# Altium PCB PCB1.pcbdoc
Units mm, origin at the board's own origin, x right, y up, seen from the top; angles counter-clockwise.
Board outline 92.49 x 53.72 mm, 2 copper layers (Top Layer, Bottom Layer); 11 components, 10 nets, 32 pads, 0 vias.
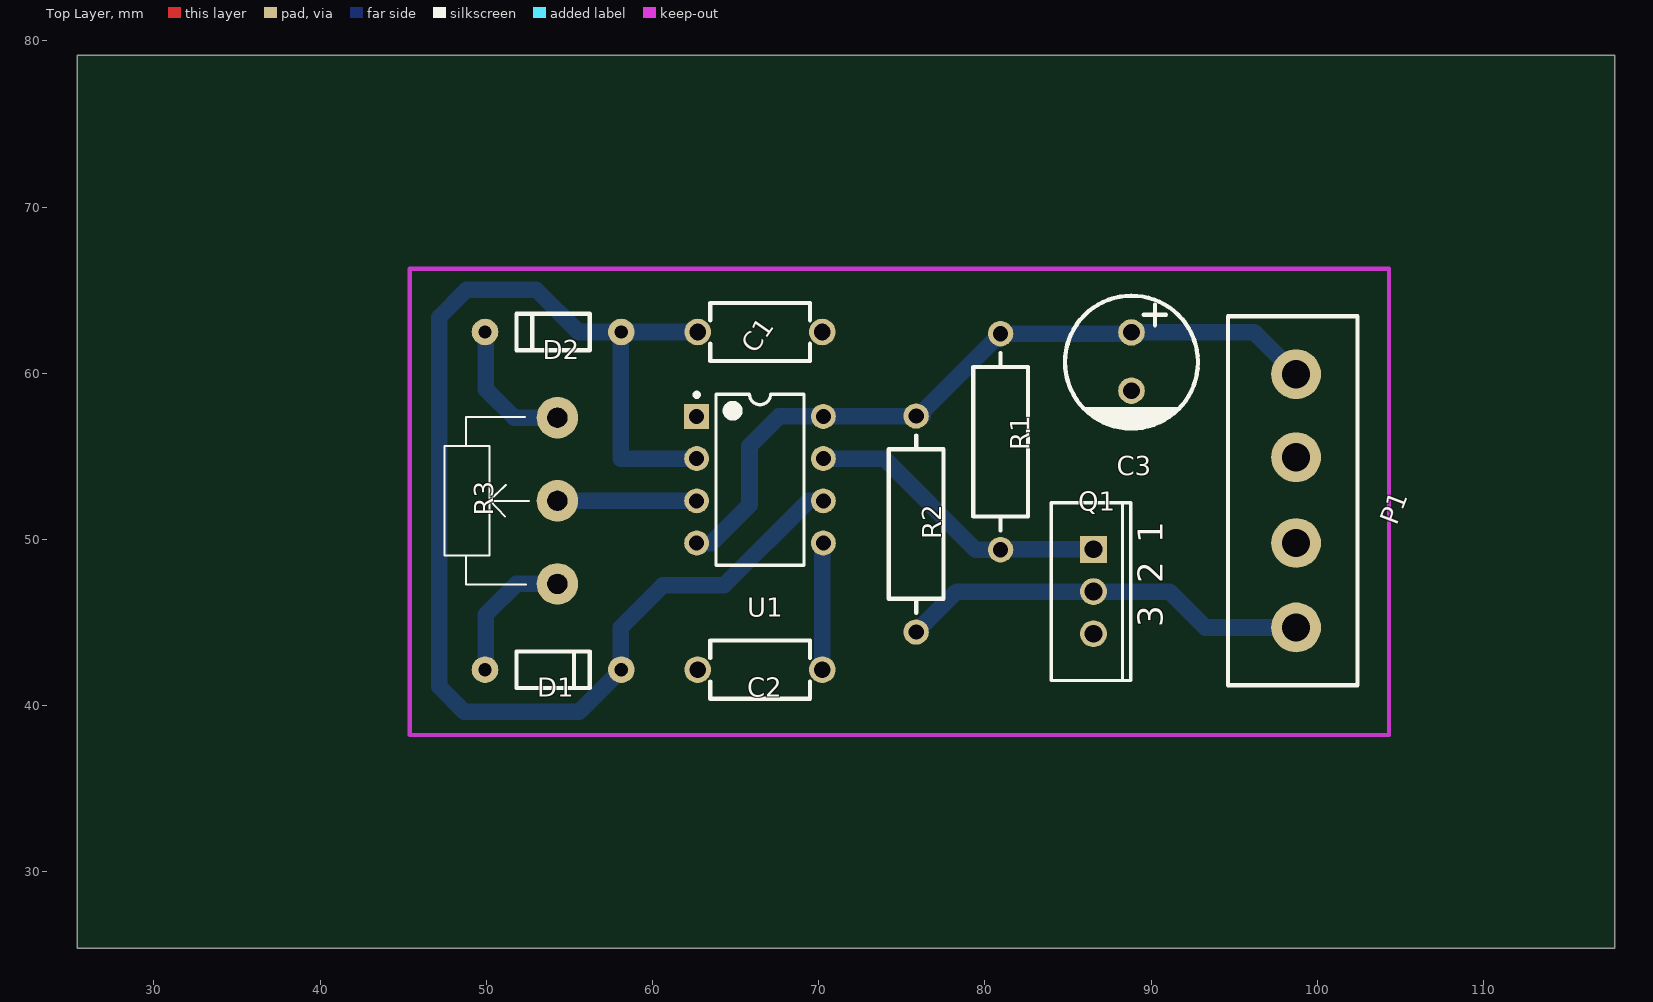
[diagram p0: Top Layer view]
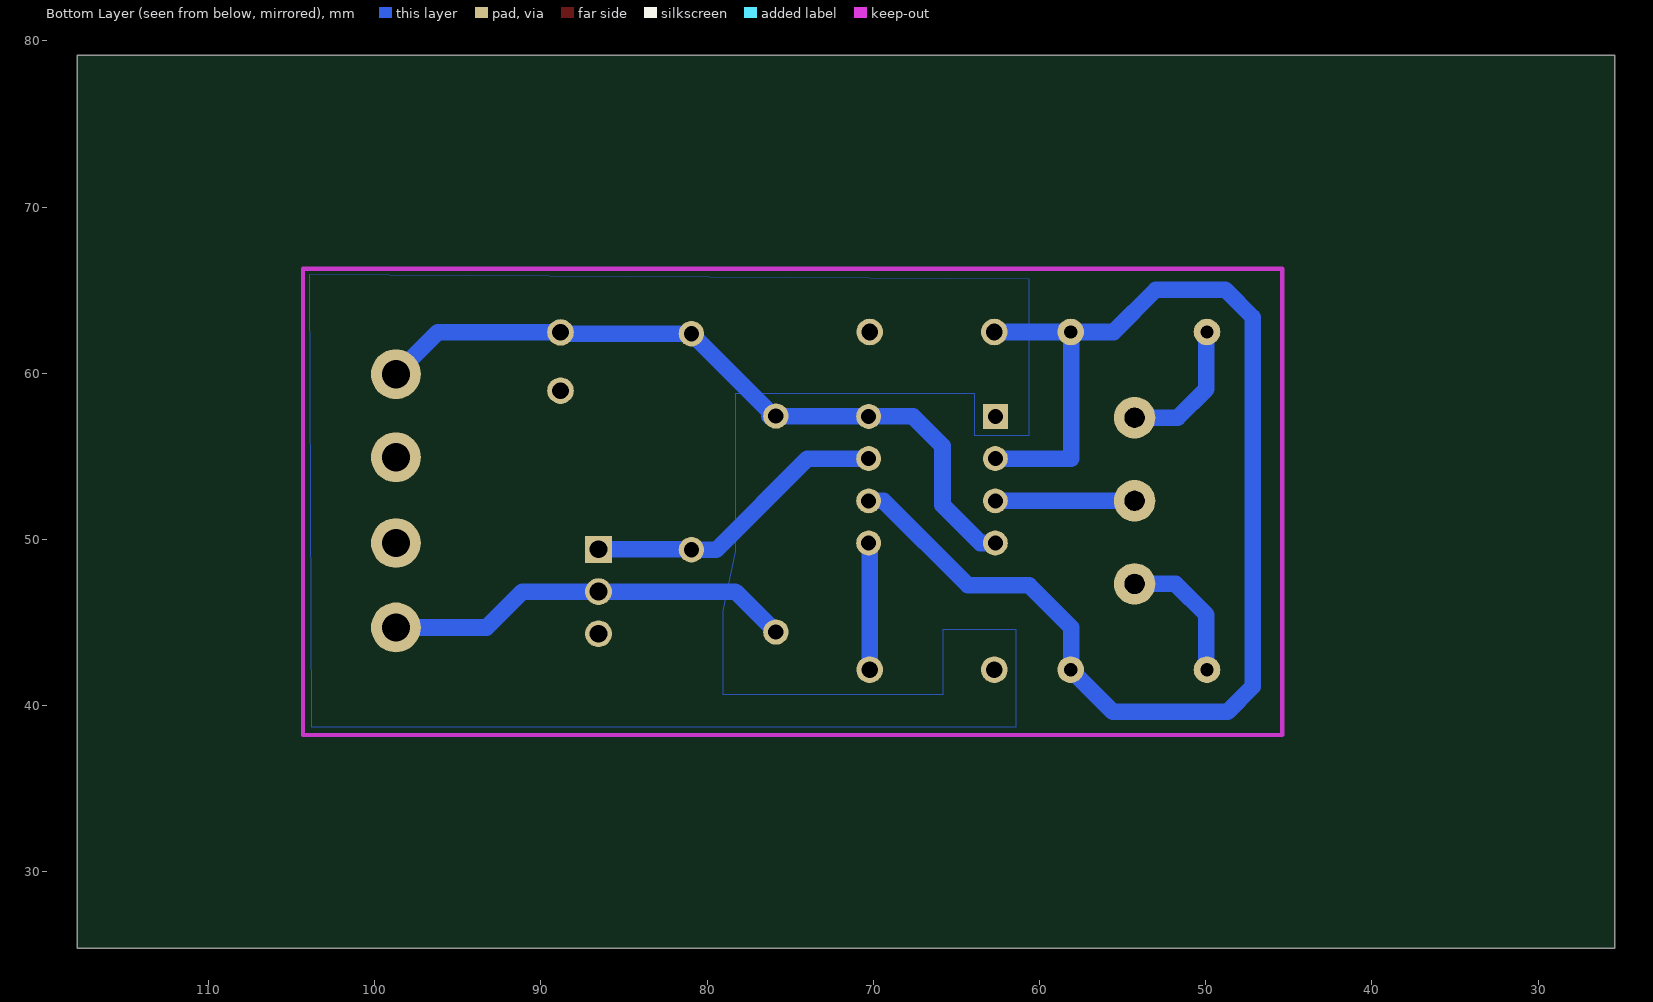
[diagram p1: Bottom Layer view, seen from below]

## Layer stack, top to bottom
Top Layer: signal copper (thickness not stored)
Dielectric: dielectric 0.32, FR-4, Dk 4.8
Bottom Layer: signal copper (thickness not stored)

## Board outline
117.889,25.4 25.4,25.4 25.4,79.121 117.889,79.121

## Components (designator, comment, footprint, x,y, rotation, side; value= is the part's Value field where it differs from the comment)
C1 "100nF" CAP-TH_L6.0-W3.5-P7.50-D1.0 66.47,62.484 r180 top
C2 "10nF" CAP-TH_L6.0-W3.5-P7.50-D1.0 66.47,42.164 r0 top
C3 "47uF" CAP-TH_BD8.0-P3.50-D1.0-FD 88.822,60.706 r270 top
D1 "1N914" DO-35_BD2.0-L4.2-P8.20-D0.5-RD 54.024,42.164 r180 top
D2 "1N914" DO-35_BD2.0-L4.2-P8.20-D0.5-RD 54.024,62.484 r0 top
P1 "WJ2EDGVC-5.08-4P" WJ2EDGVC-5.08-4P 98.728,52.324 r270 top
Q1 "IRF530" TO-220AB(TO-220-3) 86.536,46.863 r180 top
R1 "10K" RES-TH_BD3.3-L9.0-P13.00-D0.6 80.948,55.88 r90 top
R2 "2K" RES-TH_BD3.3-L9.0-P13.00-D0.6 75.868,50.927 r90 top
R3 "10 Kilo-Ohm Potentiometer" POTENTIOMETER_WIREPADS 54.278,52.324 r180 top
U1 "NE555P" DIP-8_L9.8-W6.6-P2.54-LS7.6-BL 66.47,53.594 r270 top

## Footprints (in the part's own frame and the unit in brackets; to place one, negate y for a bottom-side part, rotate by r counter-clockwise, add the part's x,y. Pads: shape width x height; smd on the part's side, far side on the other; paste and mask are expansions set on the pad)
CAP-TH_BD8.0-P3.50-D1.0-FD [mm]
  round 1.6 hole 1 paste+0 mask+0.102: 1(-1.75,0) 2(1.75,0)
  silkscreen extent -3.96,-4 4.04,4
CAP-TH_L6.0-W3.5-P7.50-D1.0 [mm]
  round 1.6 hole 1 paste+0 mask+0.102: 1(-3.75,0) 2(3.75,0)
  silkscreen extent -3,-1.75 3,1.75
DIP-8_L9.8-W6.6-P2.54-LS7.6-BL [mm]
  rect 1.5x1.5 hole 0.9 paste+0 mask+0.102: 1(-3.81,-3.81)
  round 1.5 hole 0.9 paste+0 mask+0.102: 2(-1.27,-3.81) 3(1.27,-3.81) 4(3.81,-3.81) 5(3.81,3.81) 6(1.27,3.81) 7(-1.27,3.81) 8(-3.81,3.81)
  silkscreen extent -5.23,-3.93 5.15,2.65
DO-35_BD2.0-L4.2-P8.20-D0.5-RD [mm]
  round 1.6 hole 0.8 paste+0 mask+0.102: 1(-4.1,0) 2(4.1,0)
  silkscreen extent -2.2,-1.1 2.2,1.1
POTENTIOMETER_WIREPADS [mm]
  round 2.5 hole 1.2 slot 1.205 at 0 deg paste+0 mask+0.102: 1(0,4.999) 2(0,0) 3(0,-5.001)
  silkscreen extent 1.7,-5.05 6.8,5.05
RES-TH_BD3.3-L9.0-P13.00-D0.6 [mil]
  round 60 hole 36 paste+0 mask+4: 1(-255.91,0) 2(255.9,0)
  silkscreen extent -210,-65 210,65
TO-220AB(TO-220-3) [mil]
  rect 63.5x63.5 hole 42 paste+0 mask+4: 1(0,-100)
  round 63.5 hole 42 paste+0 mask+4: 2(0,0) 3(0,100)
  silkscreen extent -89,-211 100,211
WJ2EDGVC-5.08-4P [mm]
  round 3 hole 1.7 paste+0 mask+0.102: 1(-7.62,0) 2(-2.621,0) 3(2.54,0) 4(7.62,0)
  silkscreen extent -11.1,-4.1 11.1,3.7

## Nets (pads, with @x,y where several pads share a name; then routed paths per layer and width w, separated by ;. In a path a pad name is that pad's centre, name@x,y a point inside that pad or via, vN(x,y) a via of type N, cw(c..) or ccw(c..) an arc to the next point about the centre after c; other vN are vias at no path point)
D1_2: D1.2 R3.1 | length 8.4
  Bottom Layer w1: D1.2 49.96,42.2 49.96,45.466 51.818,47.324 R3.1
D2_1: D2.1 R3.3 | length 8.5
  Bottom Layer w1: D2.1 49.96,62.448 49.96,59.055 51.691,57.324 R3.3@54.278,57.324
GND: C1.1 C2.1 C3.2 P1.2 P1.3 Q1.3 U1.1
R2_1: P1.4 Q1.2 R2.1 | length 24.8
  Bottom Layer w1: R2.1 78.304,46.863 Q1.2 91.108,46.863 93.267,44.704 P1.4
S$6: 
U1_2: C1.2 D1.1 D2.2 U1.2 U1.6 | length 81.5
  Bottom Layer w1: C1.2@61.958,62.484 D2.2 ; U1.2 58.088,54.864 58.088,62.448 D2.2 ; U1.6 69.391,52.324 64.311,47.244 60.628,47.244 58.088,44.704 58.088,42.2 D1.1 55.584,39.624 48.69,39.624 47.166,41.148 47.166,63.373 48.817,65.024 53.008,65.024 55.548,62.484 D2.2
U1_3: R3.2 U1.3 | length 8.4
  Bottom Layer w1: R3.2 U1.3
U1_4: C3.1 P1.1 R1.2 R2.2 U1.4 U1.8 | length 44.6
  Bottom Layer w1: U1.4 63.549,49.784 65.835,52.07 65.835,55.626 67.613,57.404 U1.8 76.226,57.404 76.249,57.427 76.249,57.681 R1.2 88.746,62.38 C3.1 96.216,62.456 P1.1
U1_5: C2.2 U1.5 | length 7.6
  Bottom Layer w1: C2.2 70.22,49.724 U1.5
U1_7: Q1.1 R1.1 U1.7 | length 18.5
  Bottom Layer w1: U1.7 73.963,54.864 79.447,49.38 R1.1 80.971,49.403 Q1.1

## Polygon pours and split planes (outlines as drawn)
GND on Bottom Layer (solid): 60.628,65.659 103.935,65.913 103.808,38.735 61.39,38.735 61.39,44.577 65.835,44.577 65.835,40.64 72.185,40.64 79.043,40.64 79.043,45.72 78.281,49.276 78.281,54.356 78.281,58.801 63.93,58.801 63.93,56.261 60.628,56.261

## Silkscreen, mask and mechanical layers (free items; w line width, h text height)
Document:
  lines w0.003: 71.644,52.26 71.645,52.261

## Text inside footprints (layer, text, board x,y; h text height)
Q1: Top Overlay "1" at 90.695,49.784 h1.5 r90; Top Overlay "2" at 90.695,47.371 h1.5 r90; Top Overlay "3" at 90.695,44.704 h1.5 r90